# Altium PCB Pod_Islands_Panel_1x2.PcbDoc (part 1 of 2)
Units mm, origin at the board's own origin, x right, y up, seen from the top; angles counter-clockwise.
Board outline 46.91 x 48.3 mm, 6 copper layers (Top Layer, Inner1, Inner2, Inner3, Inner4, Bottom Layer), stack 0.82 mm thick; 110 components, 94 nets, 498 pads, 368 vias.
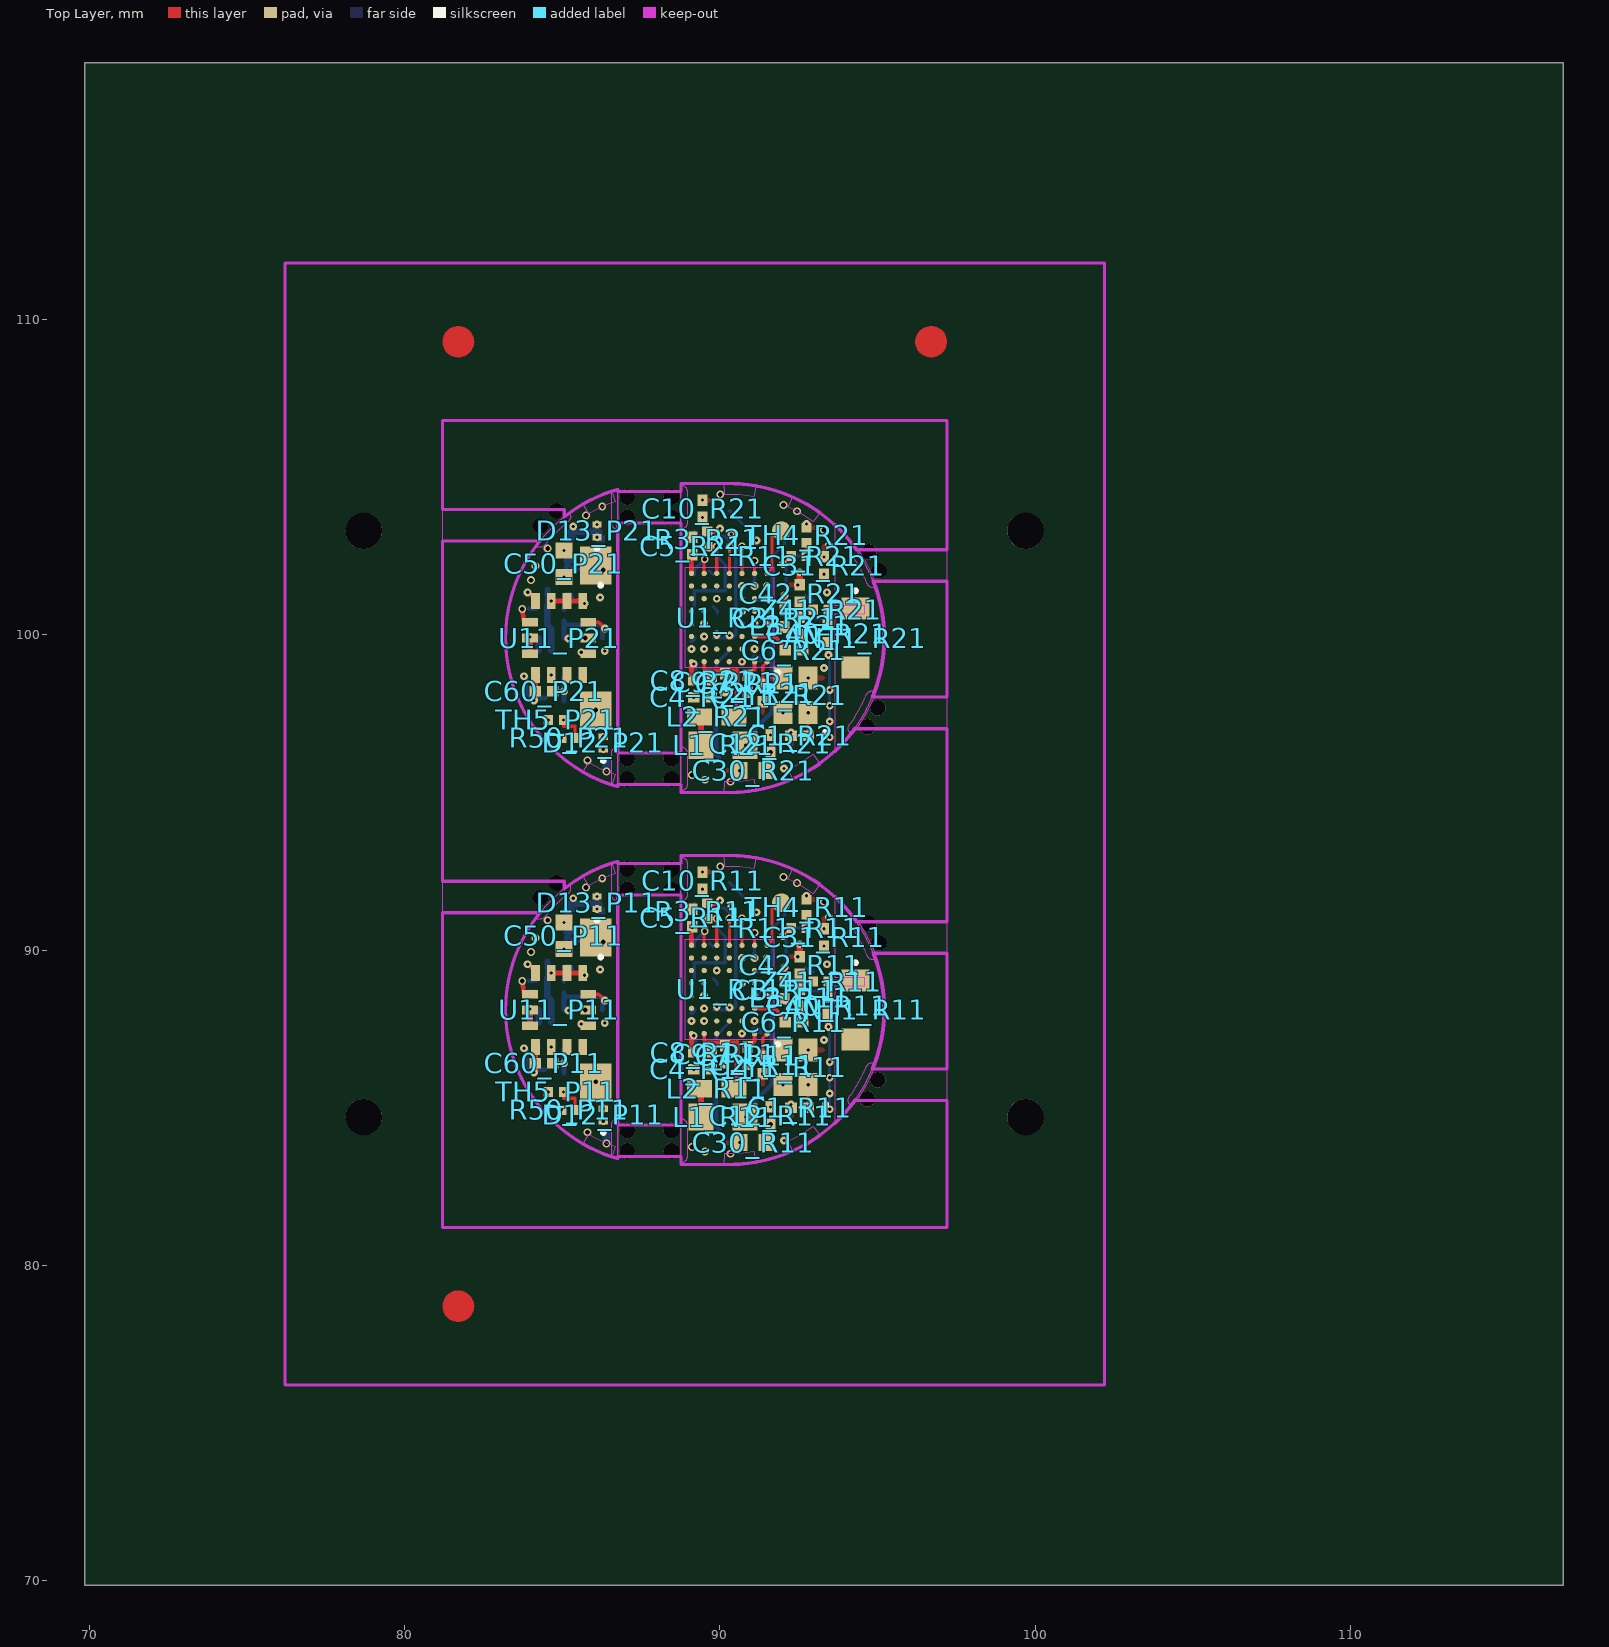
[diagram p0: Top Layer view]
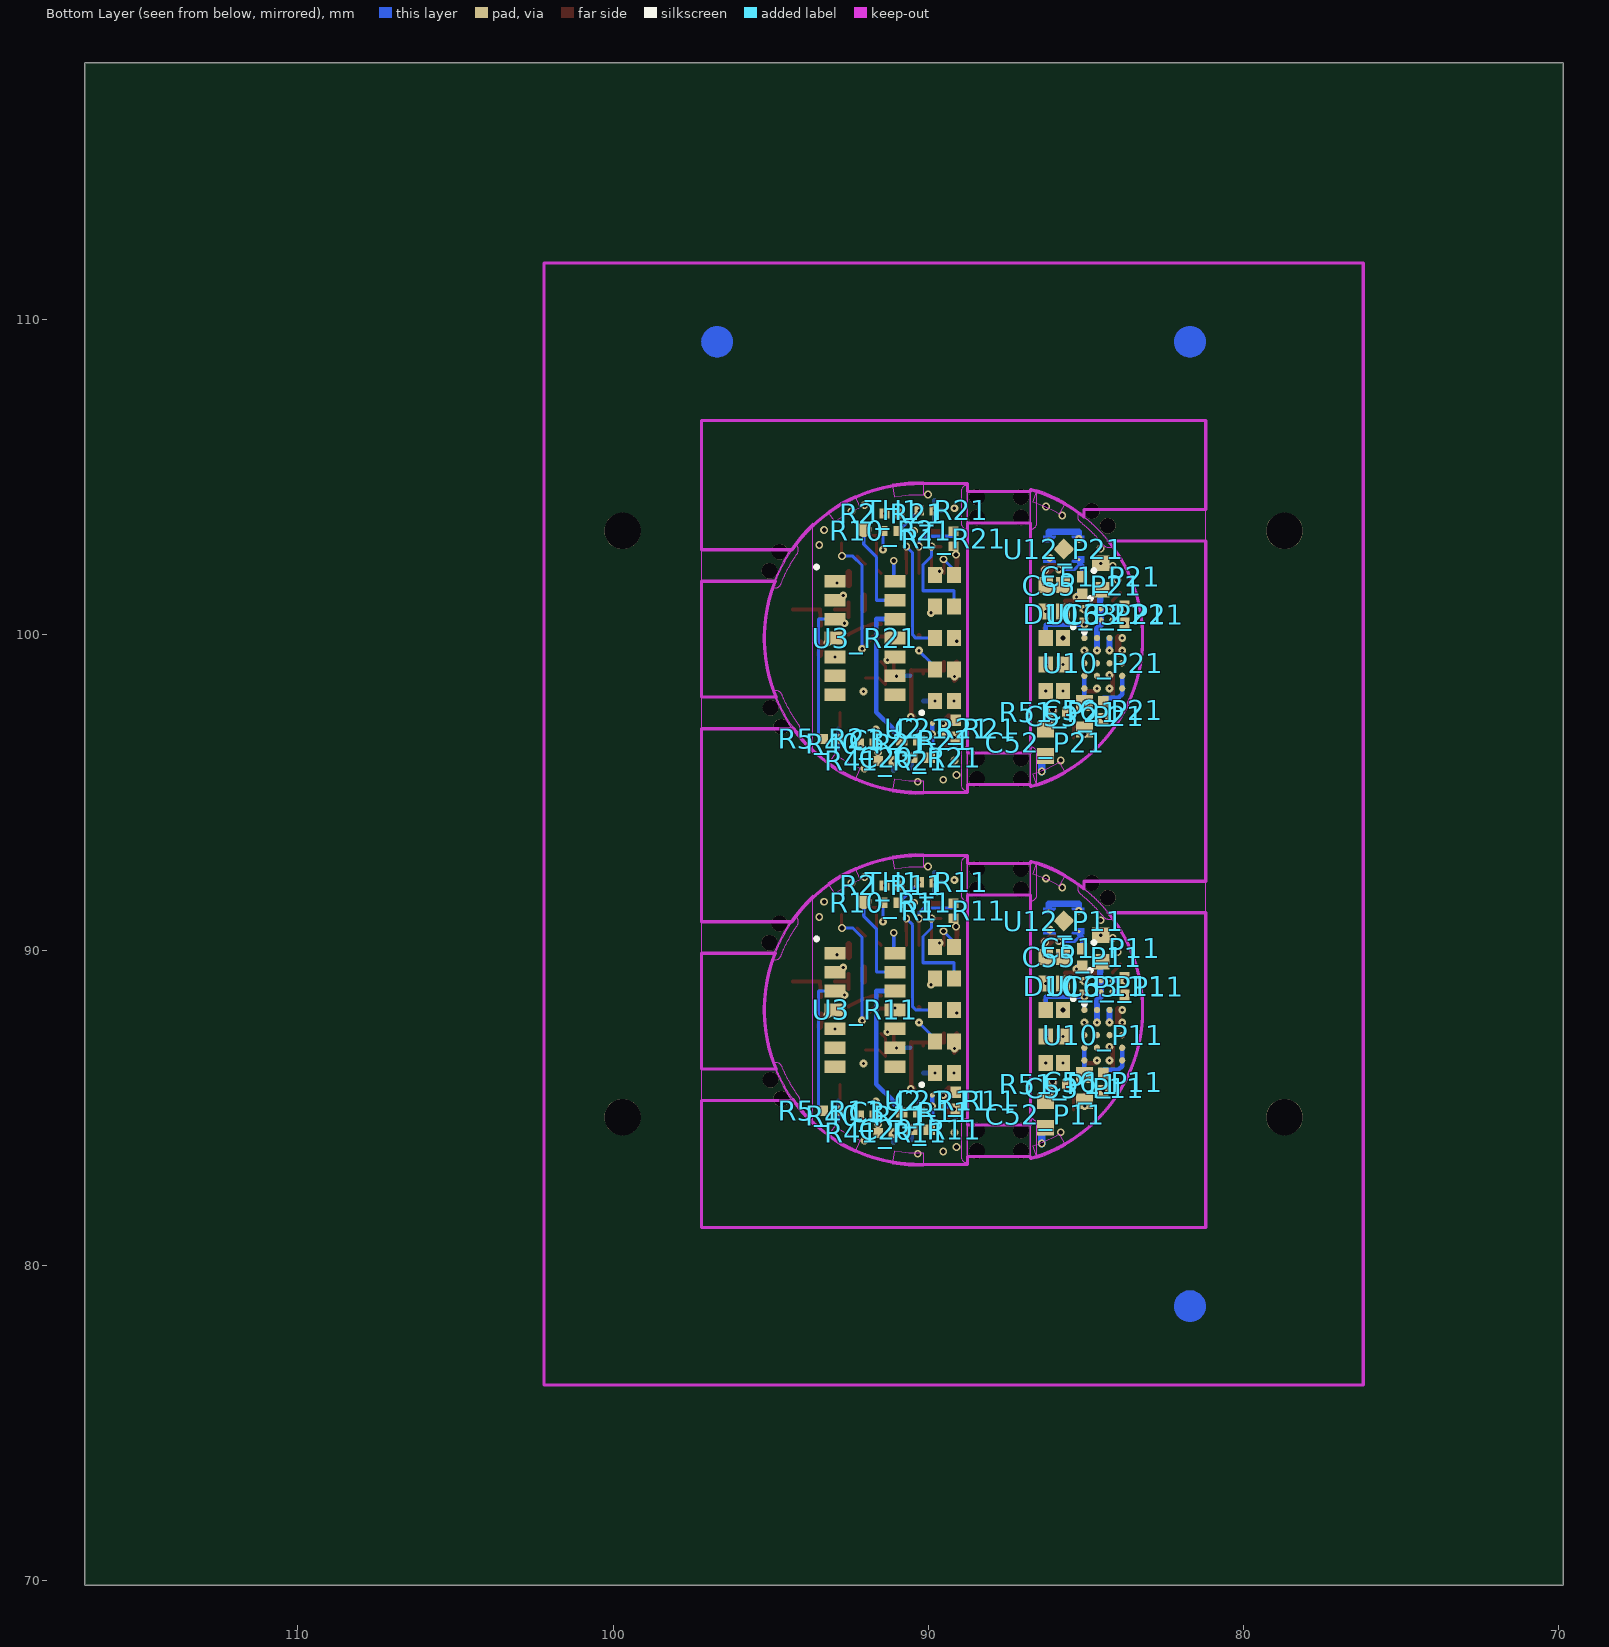
[diagram p1: Bottom Layer view, seen from below]
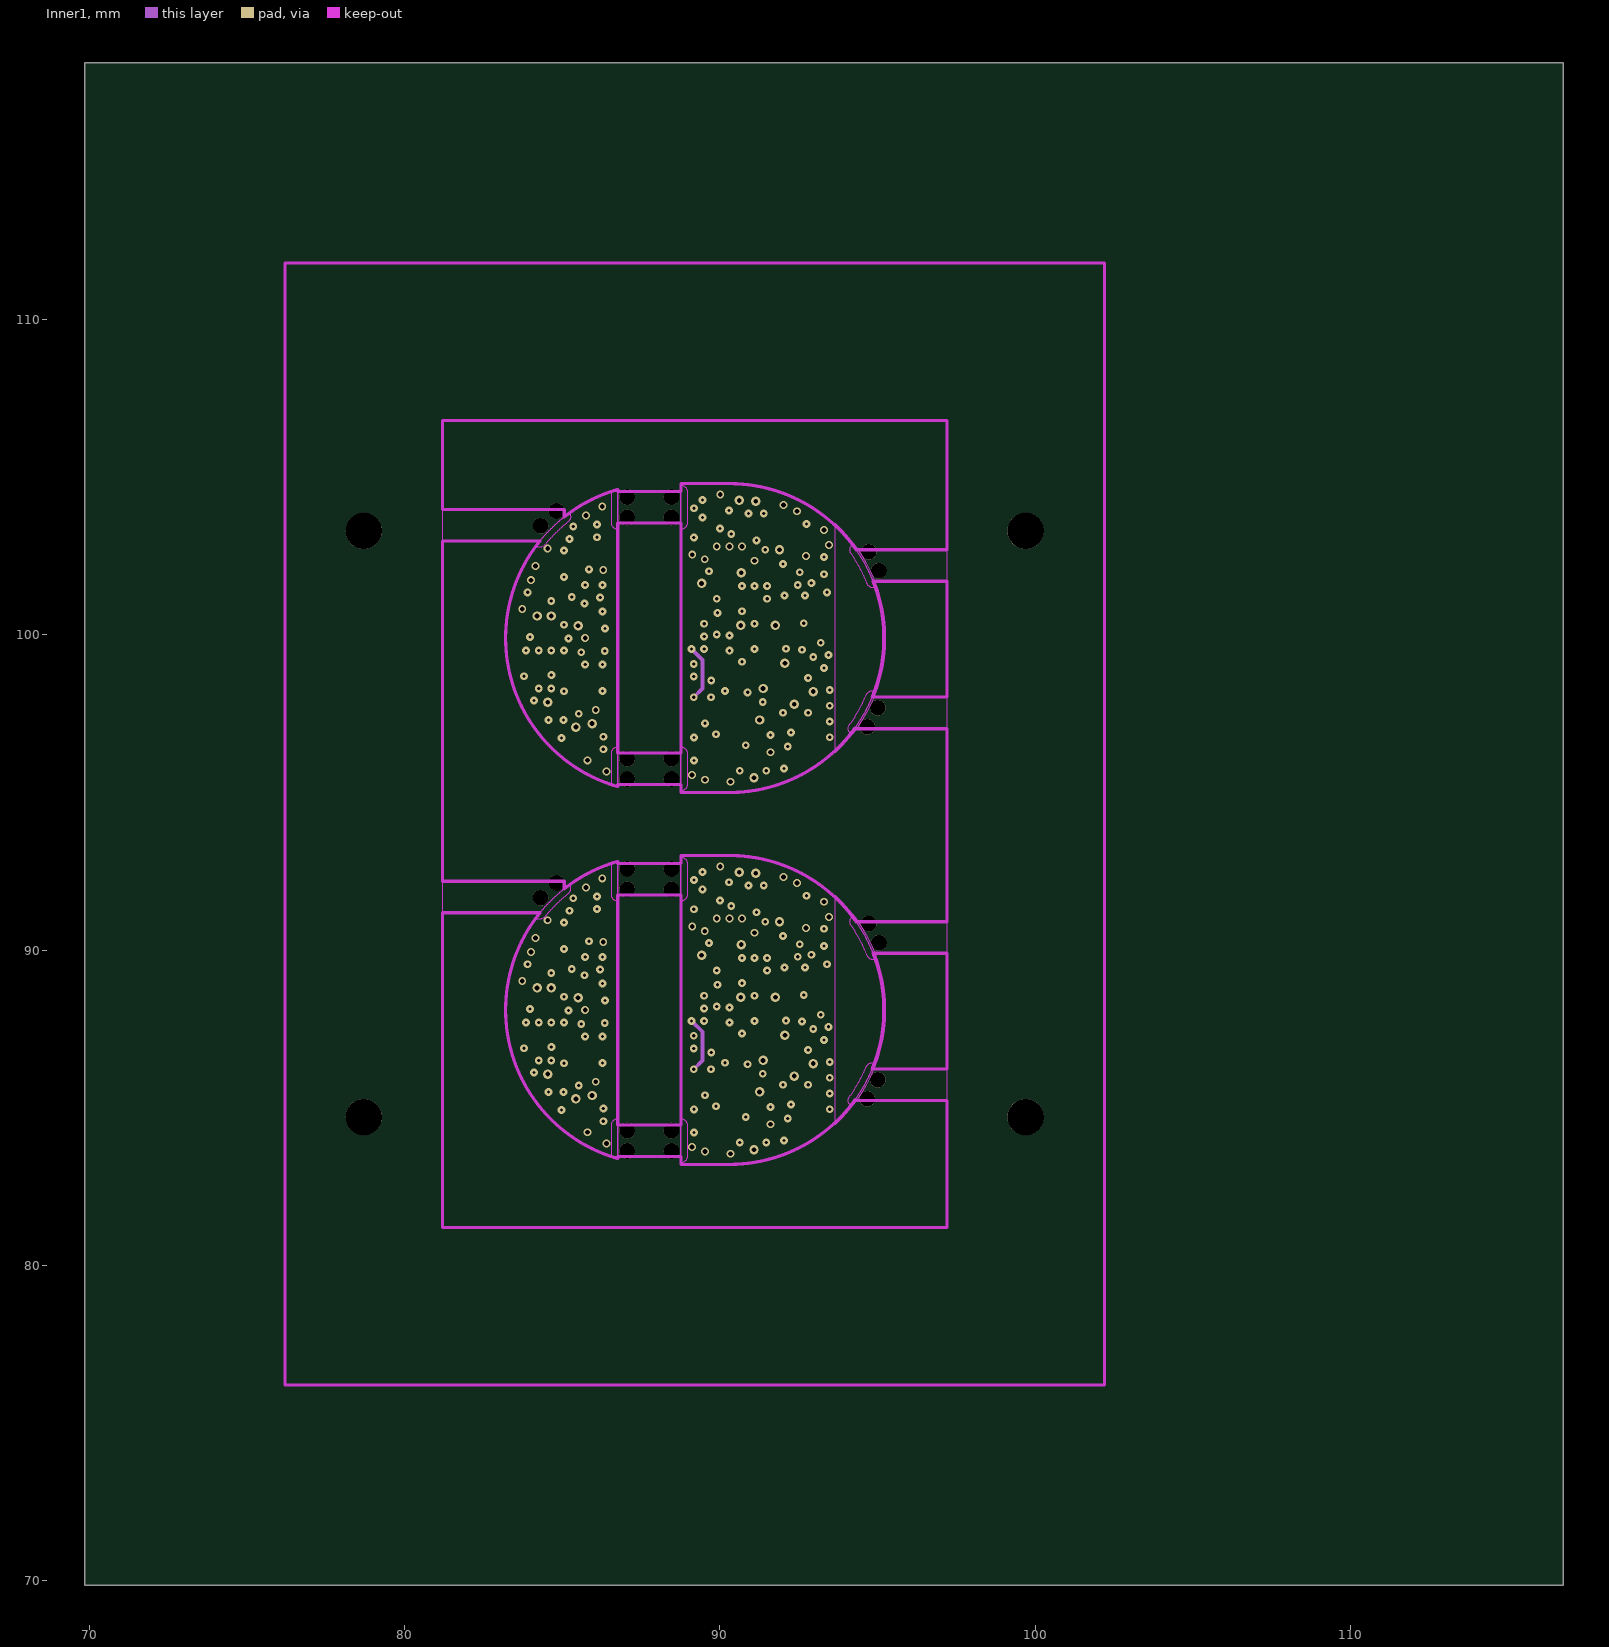
[diagram p2: Inner1]
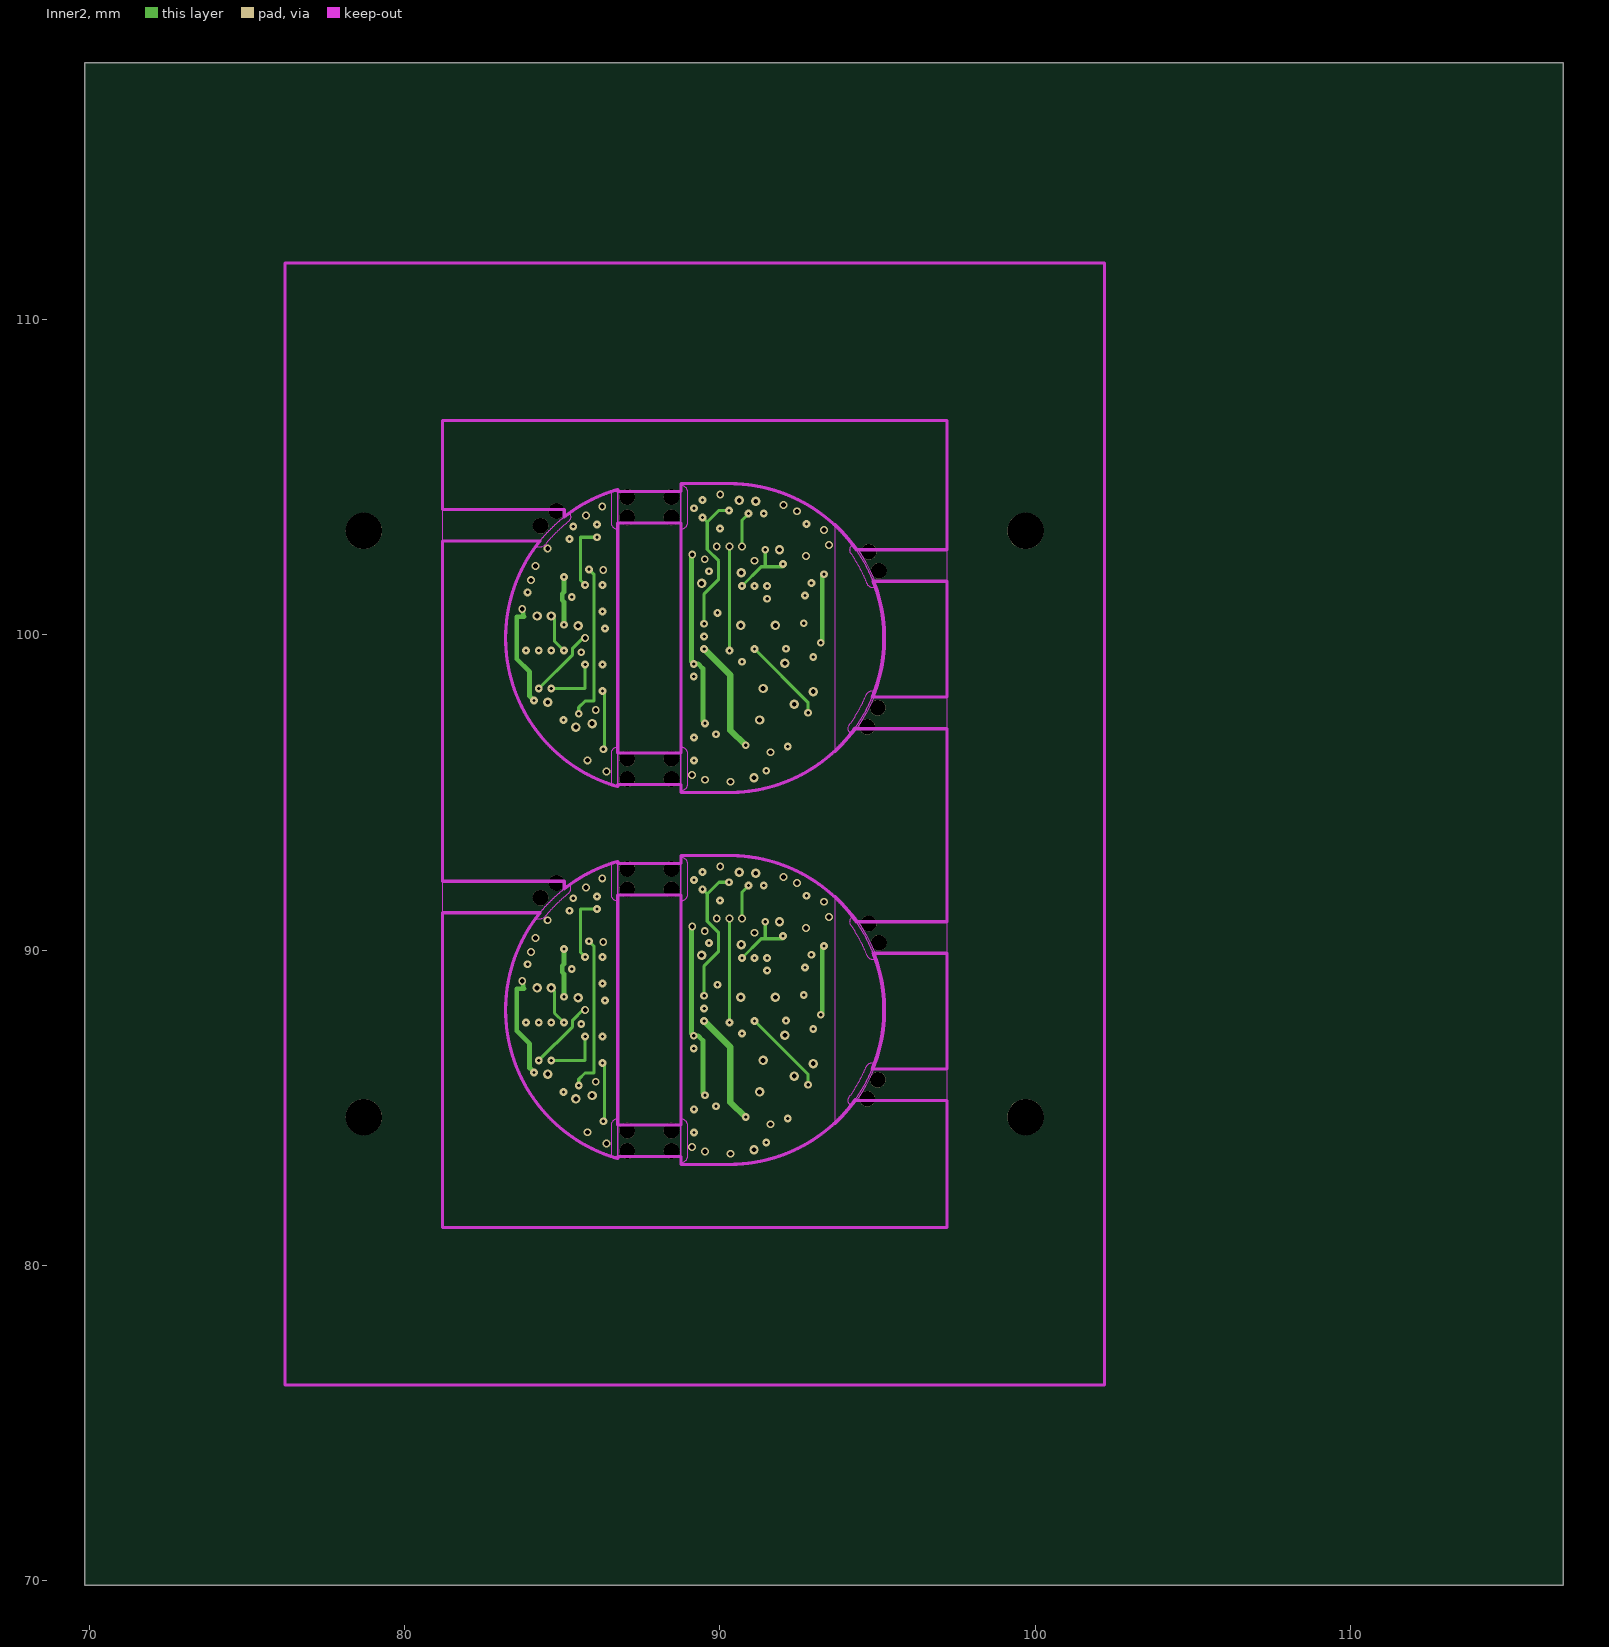
[diagram p3: Inner2]
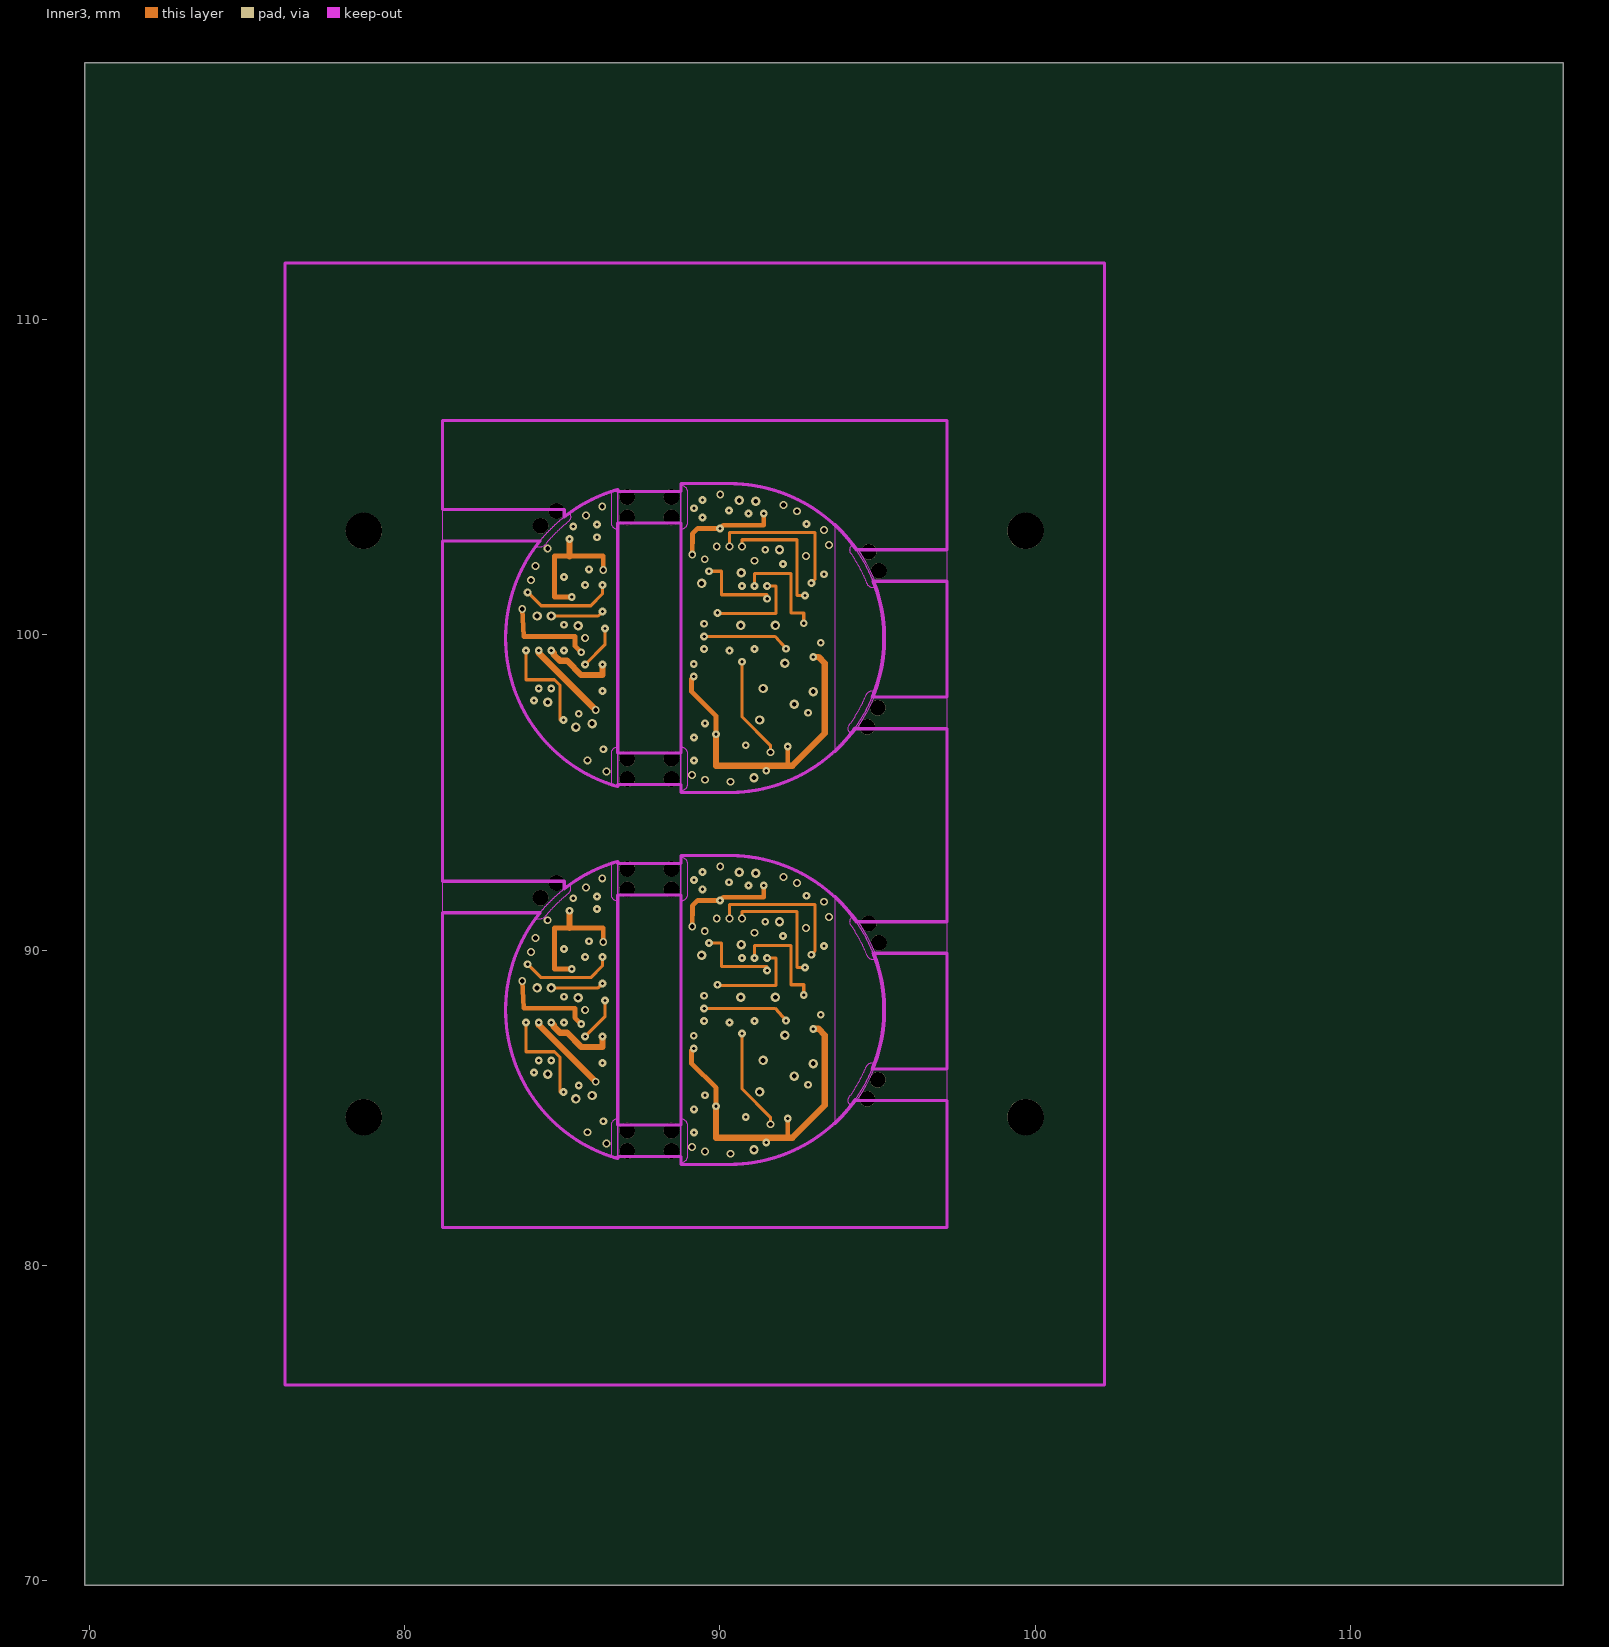
[diagram p4: Inner3]
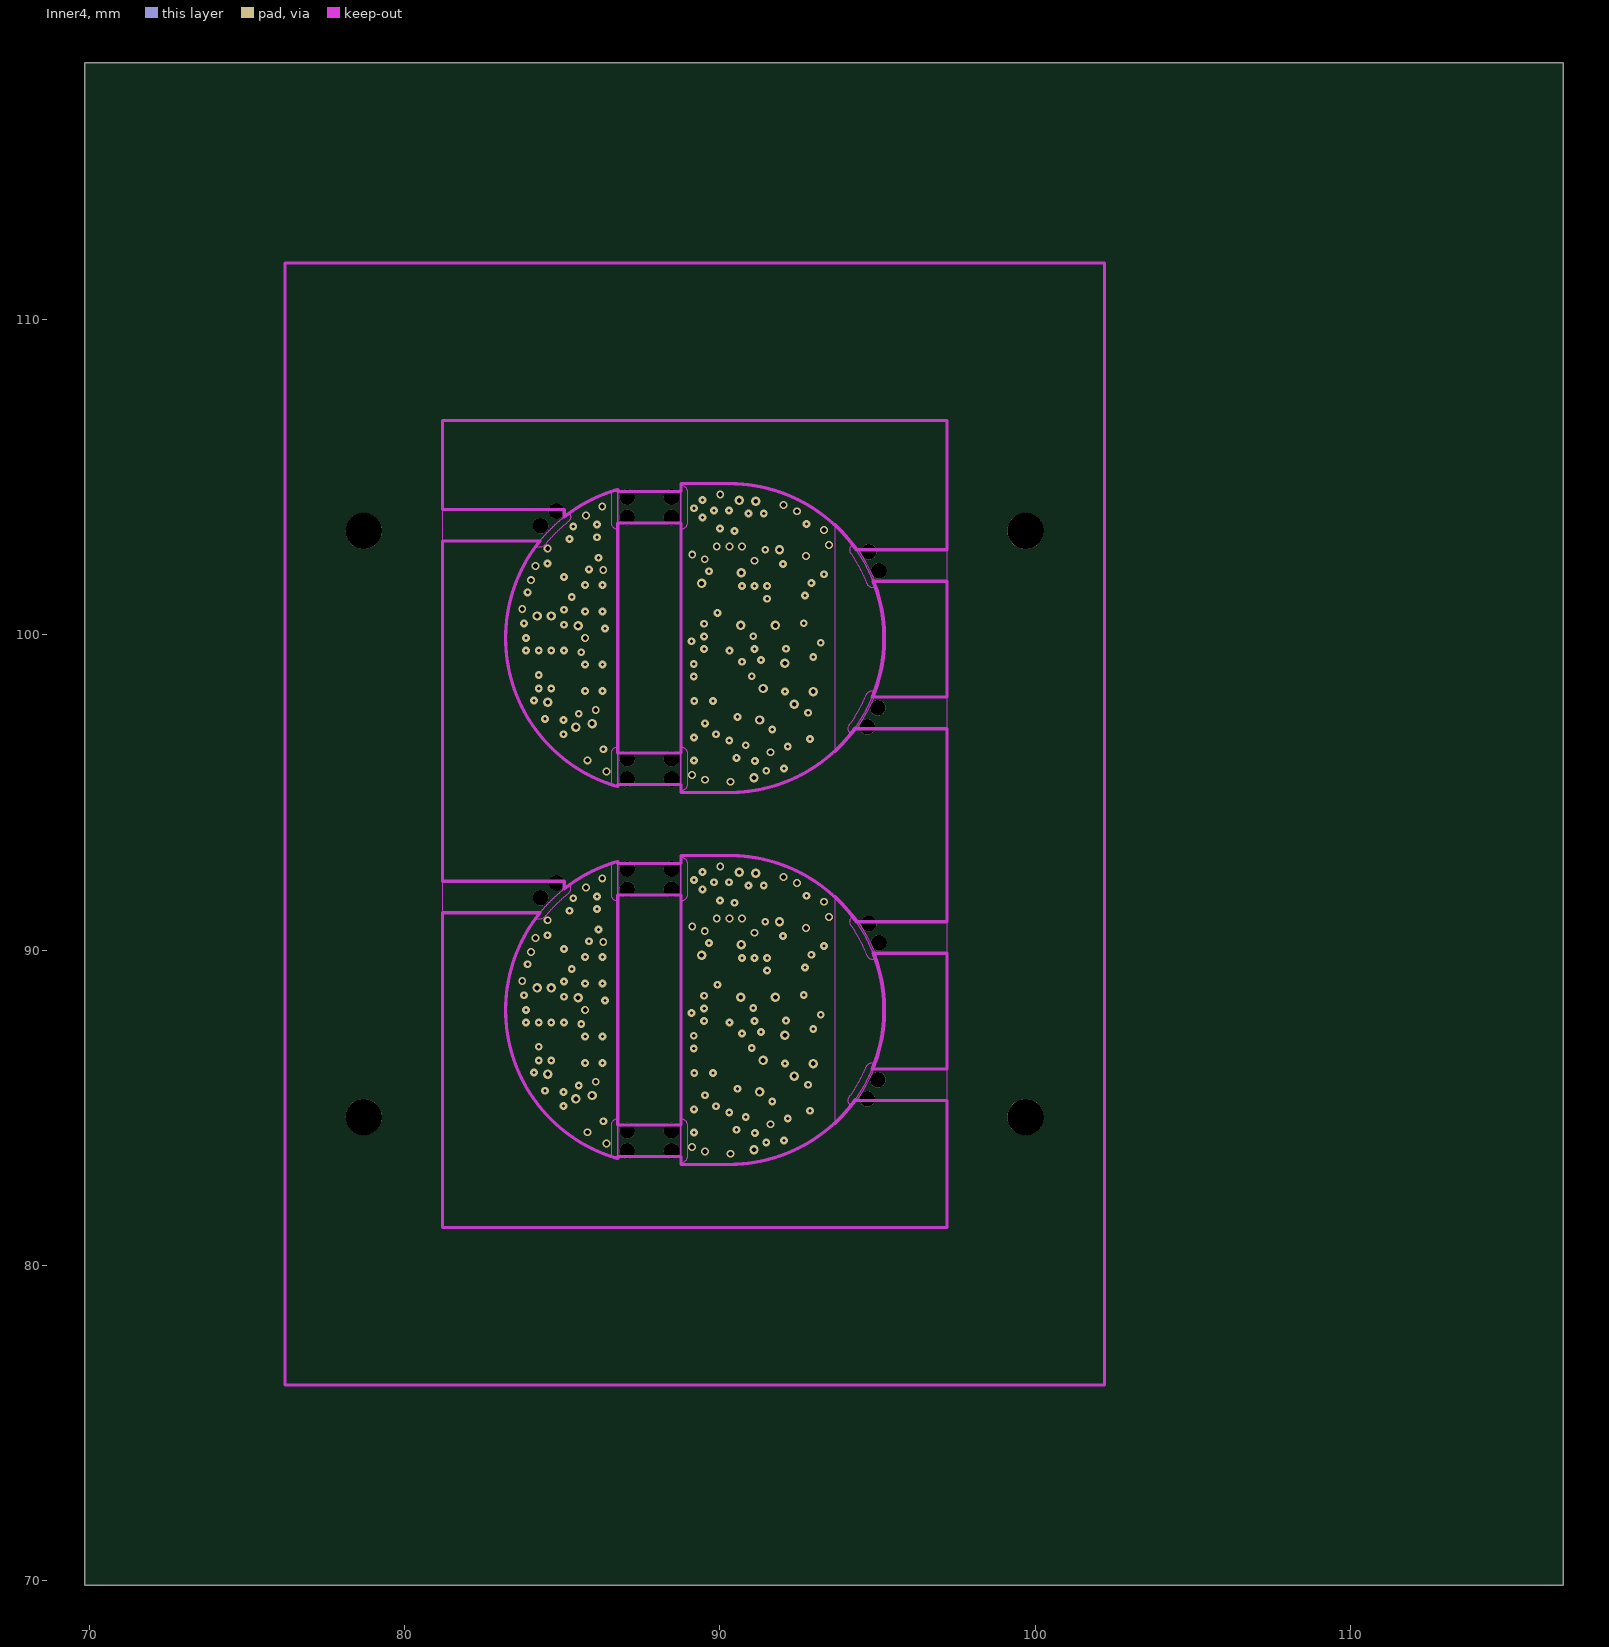
[diagram p5: Inner4]

## Layer stack, top to bottom
Top Solder Mask Layer: solder mask 0.012, Dk 3.8
Top Layer: signal copper 0.035
Dielectric1: surface 0.0964, 2313 PP, Dk 4.1
Inner1: signal copper 0.0152
Dielectric2: surface 0.15, Core 0.15, Dk 4.6
Inner2: signal copper 0.0152
Dielectric3: surface 0.1964, 2x2313 PP, Dk 4.1
Inner3: signal copper 0.0152
Dielectric4: surface 0.15, Core 0.15, Dk 4.6
Inner4: signal copper 0.0152
Dielectric5: surface 0.0964, 2313 PP, Dk 4.1
Bottom Layer: signal copper 0.035
Bottom Solder Mask Layer: solder mask 0.012, Dk 3.8

## Board outline
116.763,69.85 69.85,69.85 69.85,118.15 116.763,118.15

## Design rules (kind name [scope] priority, off if disabled: settings)
BoardOutlineClearance copperThickness1oz [All] p0: genericclearance=0.254 ignorepadtopadclearanceinfootprint=FALSE except(0: Arc-SplitContinuation Track-SplitContinuation SMDPad-SplitContinuation THPad-SplitContinuation Via-SplitContinuation Fill-SplitContinuation Poly-SplitContinuation Region-SplitContinuation Text-SplitContinuation)
BoardOutlineClearance copperThickness2oz [All] p0: genericclearance=0.254 ignorepadtopadclearanceinfootprint=FALSE except(0: Arc-SplitContinuation Track-SplitContinuation SMDPad-SplitContinuation THPad-SplitContinuation Via-SplitContinuation Fill-SplitContinuation Poly-SplitContinuation Region-SplitContinuation Text-SplitContinuation)
BoardOutlineClearance otherClearance [All] p0: genericclearance=0.254 ignorepadtopadclearanceinfootprint=FALSE except(0: Arc-SplitContinuation Track-SplitContinuation SMDPad-SplitContinuation THPad-SplitContinuation Via-SplitContinuation Fill-SplitContinuation Poly-SplitContinuation Region-SplitContinuation Text-SplitContinuation)
Clearance copperThickness1oz [All] p1: gap=0.178 ignorepadtopadclearanceinfootprint=FALSE
Clearance copperThickness2oz [All] p1: gap=0.178 ignorepadtopadclearanceinfootprint=FALSE
Clearance otherClearance [All] p1: gap=0.178 ignorepadtopadclearanceinfootprint=FALSE
DiffPairsRouting differentialPair [All] p1: maxuncoupledlength=10 minlimit=6 maxlimit=Infinity mostfreqgap=6 toplayer_minwidth=5 toplayer_prefwidth=10 toplayer_maxwidth=100 bottomlayer_minwidth=5 bottomlayer_prefwidth=10 bottomlayer_maxwidth=100 midlayer1_minwidth=5 midlayer1_prefwidth=10 midlayer1_maxwidth=100 midlayer2_minwidth=5 midlayer2_prefwidth=10 midlayer2_maxwidth=100 midlayer3_minwidth=5 midlayer3_prefwidth=10 midlayer3_maxwidth=100 midlayer4_minwidth=5 midlayer4_prefwidth=10 midlayer4_maxwidth=100
PasteMaskExpansion pasteMaskExpansion [All] p1: expansion=0
PlaneConnect innerPlane [All] p1: planeconnectstyle=Relief reliefexpansion=0.508 reliefentries=4 reliefconductorwidth=0.15 reliefairgap=0.15
PolygonConnect copperRegion [All] p1: connectstyle=Relief reliefentries=4 reliefconductorwidth=5.9055 polygonreliefangle="90 Angle" airgapwidth=5.9055
RoutingVias viaSize [All] p1: viastyle="Through Hole" holewidth=5.9056 minholewidth=5.9056 maxholewidth=248.0314 width=5.9056 minwidth=5.9056 maxwidth=248.0314
RoutingVias microVia [All] p1: viastyle="Through Hole" holewidth=3.937 minholewidth=3.937 maxholewidth=248.0314 width=3.937 minwidth=3.937 maxwidth=248.0314
RoutingVias buriedVia [All] p1: viastyle="Through Hole" holewidth=5.9056 minholewidth=5.9056 maxholewidth=248.0314 width=5.9056 minwidth=5.9056 maxwidth=248.0314
SolderMaskExpansion solderMaskExpansion [IsVia] p1: useseparateexpansions=TRUE expansion=-1000 expansionbottom=-1000
SolderMaskExpansion solderMaskExpansion [All] p2: useseparateexpansions=TRUE expansion=2 expansionbottom=2
Width copperThickness1oz [All] p1: maxlimit=100 minlimit=4 preferedwidth=4
Width copperThickness2oz [All] p1: maxlimit=100 minlimit=8 preferedwidth=10
Width RF_124 [All] p1: maxlimit=5 minlimit=5 preferedwidth=5
Width SW_200 [All] p1: maxlimit=39 minlimit=8 preferedwidth=10
Width PWR_150 [All] p1: maxlimit=39 minlimit=6 preferedwidth=8
Width DEC_150 [All] p1: maxlimit=20 minlimit=5 preferedwidth=6
Width SIG_100 [All] p1: maxlimit=10 minlimit=4 preferedwidth=4

## Components (designator, comment, footprint, x,y, rotation, side; value= is the part's Value field where it differs from the comment)
ANT1_R11 "KH-1608-H08" ANT-SMD_L1.7-W0.9 94.3,88.1 r90 top
ANT1_R21 "KH-1608-H08" ANT-SMD_L1.7-W0.9 94.3,99.9 r90 top
C1_R11 "12pF" C0201 92.53,85 r180 top
C1_R21 "12pF" C0201 92.53,96.8 r180 top
C2_R11 "12pF" C0201 91.36,86.35 r270 top
C2_R21 "12pF" C0201 91.36,98.15 r270 top
C3_R11 "1pF" C0201 92.05,88.727 r90 top
C3_R21 "1pF" C0201 92.05,100.527 r90 top
C4_R11 "100nF" C0201 89.444,86.22 r0 top
C4_R21 "100nF" C0201 89.444,98.02 r0 top
C5_R11 "100nF" C0201 89.123,91.02 r90 top
C5_R21 "100nF" C0201 89.123,102.82 r90 top
C6_R11 "100pF" C0201 92.35,87.71 r0 top
C6_R21 "100pF" C0201 92.35,99.51 r0 top
C7_R11 "100pF" C0201 90.88,86.651 r270 top
C7_R21 "100pF" C0201 90.88,98.451 r270 top
C8_R11 "4.7uF" C0201 89.449,86.75 r0 top
C8_R21 "4.7uF" C0201 89.449,98.55 r0 top
C9_R11 "1uF" C0201 90.16,86.696 r270 top
C9_R21 "1uF" C0201 90.16,98.496 r270 top
C10_R11 "10nF" C0201 89.45,92.2 r90 top
C10_R21 "10nF" C0201 89.45,104 r90 top
C12_R11 "100nF" C0201 91.6,84.75 r90 top
C12_R21 "100nF" C0201 91.6,96.55 r90 top
C20_R11 "1uF" C0201 90.25,84.3 r0 bottom
C20_R21 "1uF" C0201 90.25,96.1 r0 bottom
C21_R11 "1uF" C0201 89.13,85.22 r270 bottom
C21_R21 "1uF" C0201 89.13,97.02 r270 bottom
C30_R11 "10uF" C0402 91.05,83.89 r180 top
C30_R21 "10uF" C0402 91.05,95.69 r180 top
C31_R11 "1uF" C0201 93.3,90.4 r90 top
C31_R21 "1uF" C0201 93.3,102.2 r90 top
C32_R11 "1uF" C0201 90.57,84.85 r180 bottom
C32_R21 "1uF" C0201 90.57,96.65 r180 bottom
C40_R11 "100pF" C0201 93.411,88.229 r270 top
C40_R21 "100pF" C0201 93.411,100.029 r270 top
C42_R11 "100pF" C0201 92.53,89.511 r90 top
C42_R21 "100pF" C0201 92.53,101.311 r90 top
C50_P11 "10uF" C0402 85.051,90.456 r90 top
C50_P21 "10uF" C0402 85.051,102.256 r90 top
C51_P11 "22uF" C0402 84.53,90.05 r90 bottom
C51_P21 "22uF" C0402 84.53,101.85 r90 bottom
C52_P11 "10uF" C0402 86.285,84.78 r270 bottom
C52_P21 "10uF" C0402 86.285,96.58 r270 bottom
C53_P11 "4.7uF" C0402 85.04,85.62 r270 bottom
C53_P21 "4.7uF" C0402 85.04,97.42 r270 bottom
C55_P11 "100nF" C0201 85.12,89.765 r270 bottom
C55_P21 "100nF" C0201 85.12,101.565 r270 bottom
C56_P11 "1uF" C0201 84.45,85.81 r270 bottom
C56_P21 "1uF" C0201 84.45,97.61 r270 bottom
C60_P11 "100nF" C0201 84.42,86.41 r0 top
C60_P21 "100nF" C0201 84.42,98.21 r0 top
C63_P11 "1uF" C0201 83.78,88.84 r270 bottom
C63_P21 "1uF" C0201 83.78,100.64 r270 bottom
D10_P11 "ESD5V3U04-0201" X3-DFN0603-2_L0.6-W0.3-RD 85.05,88.85 r90 bottom
D10_P21 "ESD5V3U04-0201" X3-DFN0603-2_L0.6-W0.3-RD 85.05,100.65 r90 bottom
D12_P11 "ESD5V3U04-0201" X3-DFN0603-2_L0.6-W0.3-RD 86.3,84.77 r90 top
D12_P21 "ESD5V3U04-0201" X3-DFN0603-2_L0.6-W0.3-RD 86.3,96.57 r90 top
D13_P11 "ESD5V3U04-0201" X3-DFN0603-2_L0.6-W0.3-RD 86.1,91.5 r90 top
D13_P21 "ESD5V3U04-0201" X3-DFN0603-2_L0.6-W0.3-RD 86.1,103.3 r90 top
L1_R11 "10uH" L0603 90.1,84.7 r180 top
L1_R21 "10uH" L0603 90.1,96.5 r180 top
L2_R11 "15nH" L0402-R-RD 89.9,85.6 r0 top
L2_R21 "15nH" L0402-R-RD 89.9,97.4 r0 top
L3_R11 "3.3nH" L0201-RD 92.53,88.488 r90 top
L3_R21 "3.3nH" L0201-RD 92.53,100.288 r90 top
R1_R11 "4.7kΩ" R0201 89.2,91.25 r90 bottom
R1_R21 "4.7kΩ" R0201 89.2,103.05 r90 bottom
R2_R11 "4.7kΩ" R0201 91.15,92.05 r180 bottom
R2_R21 "4.7kΩ" R0201 91.15,103.85 r180 bottom
R3_R11 "100kΩ" R0201 89.599,91.24 r270 top
R3_R21 "100kΩ" R0201 89.599,103.04 r270 top
R5_R11 "1MΩ" R0201 93.1,84.9 r180 bottom
R5_R21 "1MΩ" R0201 93.1,96.7 r180 bottom
R10_R11 "10kΩ" R0201 91.2,91.5 r180 bottom
R10_R21 "10kΩ" R0201 91.2,103.3 r180 bottom
R11_R11 "10kΩ" R0201 92.5,90.7 r0 top
R11_R21 "10kΩ" R0201 92.5,102.5 r0 top
R40_R11 "2.2MΩ" R0201 91.95,84.75 r180 bottom
R40_R21 "2.2MΩ" R0201 91.95,96.55 r180 bottom
R41_R11 "1MΩ" R0201 91.35,84.2 r180 bottom
R41_R21 "1MΩ" R0201 91.35,96 r180 bottom
R50_P11 "10kΩ" R0201 85.22,84.93 r180 top
R50_P21 "10kΩ" R0201 85.22,96.73 r180 top
R51_P11 "330Ω" R0201 85.85,85.75 r180 bottom
R51_P21 "330Ω" R0201 85.85,97.55 r180 bottom
TH1_R11 "NCP03XH103F05RL" R0201 90.05,92.15 r180 bottom
TH1_R21 "NCP03XH103F05RL" R0201 90.05,103.95 r180 bottom
TH4_R11 "NCP03XH103F05RL" R0201 92.75,91.36 r90 top
TH4_R21 "NCP03XH103F05RL" R0201 92.75,103.16 r90 top
TH5_P11 "NCP03XH103F05RL" R0201 84.799,85.501 r180 top
TH5_P21 "NCP03XH103F05RL" R0201 84.799,97.301 r180 top
U1_R11 "NRF52832-CIAA-G-R7" WLCSP-50_L3.2-W3.0-TL_NRF52832 90.3,88.75 r180 top
U1_R21 "NRF52832-CIAA-G-R7" WLCSP-50_L3.2-W3.0-TL_NRF52832 90.3,100.55 r180 top
U2_R11 "TPS7A0218PYCHR" WLCSP-4_L0.6-W0.6-P0.35-R2-C2-TL 89.7,85.22 r180 bottom
U2_R21 "TPS7A0218PYCHR" WLCSP-4_L0.6-W0.6-P0.35-R2-C2-TL 89.7,97.02 r180 bottom
U3_R11 "MAXM86161AEFD+T" OLGA-14_L4.3-W2.9-P0.60-TL 92.01,88.1 r180 bottom
U3_R21 "MAXM86161AEFD+T" OLGA-14_L4.3-W2.9-P0.60-TL 92.01,99.9 r180 bottom
U10_P11 "BQ21061YFPR" DSBGA-20_L2.0-W1.6-R4-C5-P0.40-BL-1 84.45,87.3 r270 bottom
U10_P21 "BQ21061YFPR" DSBGA-20_L2.0-W1.6-R4-C5-P0.40-BL-1 84.45,99.1 r270 bottom
U11_P11 "LSM6DSV16BXTR" LGA-14L_L3.0-W2.5-P0.50-TL 84.9,88.1 r270 top
U11_P21 "LSM6DSV16BXTR" LGA-14L_L3.0-W2.5-P0.50-TL 84.9,99.9 r270 top
U12_P11 "AP6683" DFN-4_L1.0-W1.0-P0.65-BL-EP 85.7,90.92 r90 bottom
U12_P21 "AP6683" DFN-4_L1.0-W1.0-P0.65-BL-EP 85.7,102.72 r90 bottom
U13_P11 "TPS7A0218PYCHR" WLCSP-4_L0.6-W0.6-P0.35-R2-C2-TL 84.35,88.85 r180 bottom
U13_P21 "TPS7A0218PYCHR" WLCSP-4_L0.6-W0.6-P0.35-R2-C2-TL 84.35,100.65 r180 bottom
Y1_R11 "-" CRYSTAL-SMD_4P-L1.6-W1.2-BL 92.4,86.28 r90 top
Y1_R21 "-" CRYSTAL-SMD_4P-L1.6-W1.2-BL 92.4,98.08 r90 top
Z41_R11 "0Ω" R0201 93.2,89 r0 top
Z41_R21 "0Ω" R0201 93.2,100.8 r0 top

## Footprints (in the part's own frame and the unit in brackets; to place one, negate y for a bottom-side part, rotate by r counter-clockwise, add the part's x,y. Pads: shape width x height; smd on the part's side, far side on the other; paste and mask are expansions set on the pad)
ANT-SMD_L1.7-W0.9 [mm]
  rect 0.7x0.9 smd paste+0 mask+0.051: 1(-0.937,0) 2(0.937,0)
  silkscreen extent 1.4,-0.1 1.6,0.1
C0201 [mm]
  rect 0.368x0.324 smd paste-100 mask+0.051: 1(-0.274,0) 2(0.274,0)
C0402 [mm]
  rect 0.5x0.54 smd paste+0 mask+0.051: 1(-0.42,0) 2(0.42,0)
CRYSTAL-SMD_4P-L1.6-W1.2-BL [mm]
  rect 0.73x0.6 smd paste+0 mask+0.05: 1(-0.55,-0.4) 2(0.55,-0.4) 3(0.55,0.4) 4(-0.55,0.4)
  silkscreen extent -1.27,-1.05 -1.07,-0.85
DFN-4_L1.0-W1.0-P0.65-BL-EP [mm]
  round 0.092 smd: 1(-0.333,-0.475) 2(0.333,-0.474) 3(0.333,0.475) 4(-0.333,0.475)
  rect 0.48x0.48 smd rot 45: 5(0.004,0.001)
  Top Layer region: 0.425,-0.649 0.225,-0.649 0.225,-0.399 0.225,-0.399 0.375,-0.249 0.425,-0.249
  Top Layer region: -0.225,-0.4 -0.225,-0.65 -0.425,-0.65 -0.425,-0.25 -0.375,-0.25
  Top Layer region: -0.425,0.651 -0.225,0.651 -0.225,0.401 -0.225,0.401 -0.375,0.251 -0.425,0.251
  Top Layer region: 0.425,0.651 0.225,0.651 0.225,0.401 0.225,0.401 0.375,0.251 0.425,0.251
  silkscreen extent -0.78,-1.06 -0.58,-0.85
DSBGA-20_L2.0-W1.6-R4-C5-P0.40-BL-1 [mm]
  round 0.2 smd paste-100 mask+0.051: A1(-0.8,-0.6) A2(-0.8,-0.2) A3(-0.8,0.2) A4(-0.8,0.6) B1(-0.4,-0.6) B2(-0.4,-0.2) B3(-0.4,0.2) B4(-0.4,0.6) C1(0,-0.6) C2(0,-0.2) C3(0,0.2) C4(0,0.6) D1(0.4,-0.6) D2(0.4,-0.2) D3(0.4,0.2) D4(0.4,0.6) E1(0.8,-0.6) E2(0.8,-0.2) E3(0.8,0.2) E4(0.8,0.6)
  silkscreen extent -1.26,-1.06 -1.05,-0.85
L0201-RD [mm]
  rect 0.368x0.324 smd paste-100 mask+0.051: 1(-0.274,0) 2(0.274,0)
L0402-R-RD [mm]
  rect 0.79x0.54 smd paste-100 mask+0.051: 1(-0.545,0) 2(0.545,0)
L0603 [mm]
  rect 0.8x0.864 smd paste-100 mask+0.051: 1(-0.7,0) 2(0.7,0)
LGA-14L_L3.0-W2.5-P0.50-TL [mm]
  rect 0.5x0.28 smd: 1(-1.175,0.75) 2(-1.175,0.25) 3(-1.175,-0.25) 4(-1.175,-0.75) 8(1.175,-0.75) 9(1.175,-0.25) 10(1.175,0.25) 11(1.175,0.75)
  rect 0.28x0.5 smd: 5(-0.5,-0.925) 6(0,-0.925) 7(0.5,-0.925) 12(0.5,0.925) 13(0,0.925) 14(-0.5,0.925)
  silkscreen extent -1.78,1.22 -1.58,1.42
OLGA-14_L4.3-W2.9-P0.60-TL [mm]
  rect 0.66x0.4 smd: 1(-0.95,1.8) 2(-0.95,1.2) 3(-0.95,0.6) 4(-0.95,0) 5(-0.95,-0.6) 6(-0.95,-1.2) 7(-0.95,-1.8) 8(0.95,-1.8) 9(0.95,-1.2) 10(0.95,-0.6) 11(0.95,0) 12(0.95,0.6) 13(0.95,1.2) 14(0.95,1.8)
  silkscreen extent -1.64,2.15 -1.43,2.36
R0201 [mm]
  rect 0.303x0.324 smd paste-100 mask+0.051: 1(-0.242,0) 2(0.242,0)
WLCSP-4_L0.6-W0.6-P0.35-R2-C2-TL [mm]
  round 0.158 smd paste-100 mask+0.05: A1(-0.175,0.175) A2(0.175,0.175) B1(-0.175,-0.175) B2(0.175,-0.175)
  silkscreen extent -0.61,0.41 -0.41,0.61
WLCSP-50_L3.2-W3.0-TL_NRF52832 [mm]
  round 0.17 smd paste-100 mask+0.051: A1(-1.2,1.4) A2(-0.8,1.4) A3(-0.4,1.4) A4(0,1.4) A5(0.4,1.4) A6(0.8,1.4) A7(1.2,1.4) B2(-0.8,1) B3(-0.4,1) B4(0,1) B5(0.4,1) B6(0.8,1) B7(1.2,1) C2(-0.8,0.6) C3(-0.4,0.6) C4(0,0.6) C5(0.4,0.6) C6(0.8,0.6) C7(1.2,0.6) D1(-1.2,0.2) D2(-0.8,0.2) D3(-0.4,0.2) D6(0.8,0.2) D7(1.2,0.2) E1(-1.2,-0.2) E2(-0.8,-0.2) E3(-0.4,-0.2) E6(0.8,-0.2) E7(1.2,-0.2) F1(-1.2,-0.6) F2(-0.8,-0.6) F3(-0.4,-0.6) F4(0,-0.6) F5(0.4,-0.6) F6(0.8,-0.6) F7(1.2,-0.6) G1(-1.2,-1) G2(-0.8,-1) G3(-0.4,-1) G4(0,-1) G5(0.4,-1) G6(0.8,-1) G7(1.2,-1) H1(-1.2,-1.4) H2(-0.8,-1.4) H3(-0.4,-1.4) H4(0,-1.4) H5(0.4,-1.4) H6(0.8,-1.4) H7(1.2,-1.4)
  silkscreen extent -1.64,1.64 -1.44,1.84
X3-DFN0603-2_L0.6-W0.3-RD [mm]
  rect 0.2x0.3 smd: 1(-0.2,0) 2(0.2,0)
  silkscreen extent -0.66,-0.1 -0.45,0.1

## Free pads (board coordinates)
  rect 1.001x1.199 smd paste+0 mask+0.051: BT1(86.058,85.8) BT1(86.058,97.601) BT2(86.058,90.4) BT2(86.058,102.201)
  rect 0.45x0.5 smd far side paste+0 mask+0: JP1(86.274,86.42) JP1(86.274,98.221) JP2(86.274,87.261) JP2(86.274,99.062) JP3(86.274,88.099) JP3(86.274,99.9) JP4(86.274,88.94) JP4(86.274,100.741) JP5(86.274,89.781) JP5(86.274,101.581) JP6(85.723,86.42) JP6(85.723,98.221) JP7(85.723,87.261) JP7(85.723,99.062) JP8(85.723,88.099) JP8(85.723,99.9) JP9(85.723,88.94) JP9(85.723,100.741) JP10(85.723,89.781) JP10(85.723,101.581)
  rect 0.45x0.5 smd far side paste+0 mask+0.051: JR1(89.185,86.1) JR1(89.185,97.901) JR2(89.185,87.101) JR2(89.185,98.902) JR3(89.185,88.099) JR3(89.185,99.9) JR4(89.185,89.1) JR4(89.185,100.901) JR5(89.185,90.101) JR5(89.185,101.901) JR6(89.784,86.1) JR6(89.784,97.901) JR7(89.784,87.101) JR7(89.784,98.902) JR8(89.784,88.099) JR8(89.784,99.9) JR9(89.784,89.1) JR9(89.784,100.901) JR10(89.784,90.101) JR10(89.784,101.901)
  round 0.5 hole 0.5 unplated: MB1(87.06,83.625) MB2(87.06,84.275) MB3(88.46,83.625) MB4(88.46,84.275) MB5(87.06,91.925) MB6(87.06,92.575) MB7(88.46,91.925) MB8(88.46,92.575) MB9(84.813,92.13) MB10(84.309,91.66) MB11(94.671,85.283) MB12(95.005,85.886) MB13(95.043,90.232) MB14(94.719,90.84) MB15(87.06,95.425) MB16(87.06,96.075) MB17(88.46,95.425) MB18(88.46,96.075) MB19(87.06,103.725) MB20(87.06,104.375) MB21(88.46,103.725) MB22(88.46,104.375) MB23(84.813,103.93) MB24(84.309,103.46) MB25(94.671,97.083) MB26(95.005,97.686) MB27(95.043,102.032) MB28(94.719,102.64)
  round 1.152 hole 1.152 unplated: TH1(78.7,84.7) TH2(99.7,84.7) TH3(78.7,103.3) TH4(99.7,103.3)
  round 0.599 smd paste+0 mask+0.051: TP1(91.951,91.5) TP1(91.951,103.301)
  round 0.5 smd far side paste+0 mask+0.051: TP2(92.05,91.551) TP2(92.05,103.352)

## Via types
v1: diameter 0.249, hole 0.102, Top Layer to Inner1, 92 vias
v2: diameter 0.249, hole 0.102, Inner1 to Bottom Layer, 74 vias
v3: diameter 0.249, hole 0.102, Top Layer to Inner4, 58 vias
v4: diameter 0.249, hole 0.152, Top Layer to Bottom Layer, 54 vias
v5: diameter 0.249, hole 0.102, Inner4 to Bottom Layer, 52 vias
v6: diameter 0.3, hole 0.152, Inner1 to Inner4, 38 vias

## Nets (pads, with @x,y where several pads share a name; then routed paths per layer and width w, separated by ;. In a path a pad name is that pad's centre, name@x,y a point inside that pad or via, vN(x,y) a via of type N, cw(c..) or ccw(c..) an arc to the next point about the centre after c; other vN are vias at no path point)
ANT_FEED_R11: ANT1_R11.2 C40_R11.1 Z41_R11.2 | length 1.4
  Top Layer w0.124: C40_R11.1@93.411,88.503 93.442,89.001 ANT1_R11.2@94.301,89.001
ANT_FEED_R21: ANT1_R21.2 C40_R21.1 Z41_R21.2 | length 1.4
  Top Layer w0.124: C40_R21.1@93.412,100.303 Z41_R21.2@93.442,100.8 ANT1_R21.2@94.301,100.801
ANT_NRF_R11: C3_R11.1 L3_R11.1 U1_R11.D1 | length 1.1
  Top Layer w0.124: U1_R11.D1@91.499,88.551 91.679,88.551 cw(c91.682,88.18) 91.865,88.503 ccw(c92.052,88.825) C3_R11.1@92.05,88.452 L3_R11.1@92.53,88.213
ANT_NRF_R21: C3_R21.1 L3_R21.1 U1_R21.D1 | length 1.1
  Top Layer w0.124: U1_R21.D1@91.499,100.351 91.679,100.351 cw(c91.682,99.981) 91.865,100.304 ccw(c92.052,100.626) 92.05,100.253 L3_R21.1@92.53,100.013
BQ_VDD_P11: C53_P11.1 U10_P11.D1 U10_P11.E1 | length 0.8
  Bottom Layer w0.15: C53_P11.1@85.051,86.1 85.051,86.499 U10_P11.D1@85.051,86.9
BQ_VDD_P21: C53_P21.1 U10_P21.D1 U10_P21.E1 | length 0.8
  Bottom Layer w0.15: C53_P21.1@85.051,97.9 85.051,98.299 U10_P21.D1@85.051,98.7
CELL_N_P11: C55_P11.2 pad.BT2@86.058,90.4 U12_P11.2 U12_P11.3 | length 6.3
  Top Layer w0.3: pad.BT2@86.06,90.4 86.2,90.26 v4(86.3,90.26)
  Inner3 w0.15: v2(85.3,89.4) 84.75,89.4 84.75,90.7 85.226,90.7 86.3,90.7 v4(86.3,90.26)
  Inner3 w0.2: 85.226,90.7 v2(85.226,91.246)
  Bottom Layer w0.15: C55_P11.2@85.12,89.49 85.27,89.49 v2(85.3,89.4)
  Bottom Layer w0.2: v2(85.226,91.246) 85.226,91.47 86.176,91.47 U12_P11.3@86.176,91.246
CELL_N_P21: C55_P21.2 pad.BT2@86.058,102.201 U12_P21.2 U12_P21.3 | length 6.3
  Top Layer w0.3: pad.BT2@86.06,102.2 86.2,102.06 v4(86.3,102.06)
  Inner3 w0.15: v2(85.3,101.2) 84.75,101.2 84.75,102.5 85.226,102.5 86.3,102.5 v4(86.3,102.06)
  Inner3 w0.2: 85.226,102.5 v2(85.226,103.046)
  Bottom Layer w0.15: C55_P21.2@85.12,101.291 85.27,101.29 v2(85.3,101.2)
  Bottom Layer w0.2: v2(85.226,103.046) 85.226,103.27 86.176,103.27 U12_P21.3@86.176,103.046
CELL_P_P11: C52_P11.1 pad.BT1@86.058,85.8 R51_P11.1 U10_P11.A3 U10_P11.B3 | length 3.6
  Top Layer w0.3: pad.BT1@86.06,85.801 v4(86.06,85.82)
  Inner3 w0.2: v2(84.251,87.7) 84.251,87.625 86.06,85.816 v4(86.06,85.82)
  Bottom Layer w0.2: v2(84.251,87.7) U10_P11.A3@84.251,88.099
  Bottom Layer w0.25: v4(86.06,85.82) 86.06,85.782 R51_P11.1@86.093,85.75 ; R51_P11.1@86.093,85.748 86.2,85.64 C52_P11.1@86.2,85.35
CELL_P_P21: C52_P21.1 pad.BT1@86.058,97.601 R51_P21.1 U10_P21.A3 U10_P21.B3 | length 3.6
  Top Layer w0.3: pad.BT1@86.06,97.601 v4(86.06,97.62)
  Inner3 w0.2: v2(84.251,99.5) 84.251,99.425 86.06,97.616 v4(86.06,97.62)
  Bottom Layer w0.2: v2(84.251,99.5) U10_P21.A3@84.251,99.899
  Bottom Layer w0.25: v4(86.06,97.62) 86.06,97.582 R51_P21.1@86.093,97.55 ; R51_P21.1@86.093,97.548 86.2,97.44 C52_P21.1@86.2,97.15
CHG_PG_P11: pad.JP4@86.274,88.94 U10_P11.B1 | length 2.9
  Inner2 w0.1: v6(84.65,88.8) 84.75,88.7 84.75,88 v2(85.051,87.7)
  Inner3 w0.1: v6(84.65,88.8) 86.135,88.8 v2(86.275,88.94)
CHG_PG_P21: pad.JP4@86.274,100.741 U10_P21.B1 | length 2.9
  Inner2 w0.1: v6(84.65,100.6) 84.75,100.5 84.75,99.8 v2(85.051,99.5)
  Inner3 w0.1: v6(84.65,100.6) 86.135,100.6 v2(86.275,100.74)
CHG_PG_R11: pad.JR4@89.185,89.1 R3_R11.2 U1_R11.H5 | length 4.2
  Top Layer w0.1: R3_R11.2@89.599,90.998 89.897,90.997 v4(89.9,91) U1_R11.H5@89.899,90.149
  Bottom Layer w0.1: pad.JR4@89.185,89.1 89.185,89.6 90.17,89.6 90.17,90.43 89.9,90.7 v4(89.9,91)
CHG_PG_R21: pad.JR4@89.185,100.901 R3_R21.2 U1_R21.H5 | length 4.2
  Top Layer w0.1: R3_R21.2@89.599,102.797 89.897,102.797 v4(89.9,102.8) U1_R21.H5@89.899,101.949
  Bottom Layer w0.1: pad.JR4@89.185,100.9 89.185,101.4 90.17,101.4 90.17,102.23 89.9,102.5 v4(89.9,102.8)
DCC_L_R11: L1_R11.2 L2_R11.1 | length 0.9
  Top Layer w0.2: L2_R11.1@89.355,85.6 89.401,85.554 L1_R11.2@89.401,84.701
DCC_L_R21: L1_R21.2 L2_R21.1 | length 0.9
  Top Layer w0.2: L2_R21.1@89.355,97.4 89.401,97.354 L1_R21.2@89.4,96.5
DCC_R11: L1_R11.1 U1_R11.B6 | length 3.6
  Inner2 w0.2: v3(89.5,87.751) 90.325,86.926 90.325,85.175 v3(90.82,84.701)
DCC_R21: L1_R21.1 U1_R21.B6 | length 3.6
  Inner2 w0.2: v3(89.5,99.551) 90.325,98.726 90.325,96.975 v3(90.82,96.501)
DEC1_R11: C4_R11.1 U1_R11.B7 | length 1.8
  Inner1 w0.12: v1(89.101,87.751) 89.445,87.407 89.445,86.495 v1(89.17,86.22)
DEC1_R21: C4_R21.1 U1_R21.B7 | length 1.8
  Inner1 w0.12: v1(89.101,99.551) 89.445,99.207 89.445,98.295 v1(89.17,98.02)
DEC2_R11: C7_R11.1 U1_R11.A2 | length 0.5
  Top Layer w0.12: C7_R11.1@90.88,86.926 91.1,87.106 U1_R11.A2@91.1,87.35
DEC2_R21: C7_R21.1 U1_R21.A2 | length 0.5
  Top Layer w0.12: C7_R21.1@90.88,98.726 91.1,98.906 U1_R21.A2@91.1,99.15
DEC3_R11: C6_R11.1 U1_R11.C2 | length 1.2
  Top Layer w0.12: U1_R11.C2@91.1,88.15 91.75,88.15 92.076,87.785 C6_R11.1@92.076,87.71
DEC3_R21: C6_R21.1 U1_R21.C2 | length 1.2
  Top Layer w0.12: U1_R21.C2@91.1,99.95 91.75,99.95 92.076,99.585 C6_R21.1@92.076,99.51
DEC4_R11: C9_R11.1 L2_R11.2 U1_R11.A6 | length 2.9
  Top Layer w0.12: U1_R11.A6@89.5,87.35 89.5,87.07 C9_R11.1@90.16,87.07 ; C9_R11.1@90.16,86.971 C9_R11.1@90.16,87.07 ; 90.545,87.07 C9_R11.1@90.16,87.07
  Top Layer w0.15: L2_R11.2@90.445,85.6 90.545,85.7 90.545,87.07
DEC4_R21: C9_R21.1 L2_R21.2 U1_R21.A6 | length 2.9
  Top Layer w0.12: U1_R21.A6@89.5,99.15 89.5,98.87 C9_R21.1@90.16,98.87 ; C9_R21.1@90.16,98.77 C9_R21.1@90.16,98.87 ; 90.545,98.87 C9_R21.1@90.16,98.87
  Top Layer w0.15: L2_R21.2@90.445,97.4 90.545,97.5 90.545,98.87
GND_P11: C50_P11.2 C51_P11.2 C52_P11.2 C53_P11.2 C56_P11.2 C60_P11.2 C63_P11.2 D10_P11.2 D12_P11.2 D13_P11.2 pad.JP6@85.723,86.42 pad.JP9@85.723,88.94 R50_P11.2 TH5_P11.2 U10_P11.A4 U10_P11.D3 U11_P11.1 U11_P11.2 U11_P11.3 U11_P11.6 U11_P11.7 U11_P11.9 U12_P11.4 U13_P11.B2 | length 2.5
  Top Layer w0.15: v1(84.65,89.275) U11_P11.2@85.15,89.275 U11_P11.1@85.651,89.275 ; C60_P11.2@84.696,86.41 v1(85.05,86.41)
  Top Layer w0.2: U11_P11.7@83.975,87.6 U11_P11.6@83.975,88.1 v1(83.974,88.129)
  Bottom Layer w0.15: 83.942,88.676 U13_P11.B2@84.175,88.676 ; U10_P11.D3@84.251,86.9 v5(84.251,86.93) ; v5(85.051,89) D10_P11.2@85.051,89.049
  Bottom Layer w0.25: v4(86.404,83.867) C52_P11.2@86.404,84.15
  other v1: 84.977,84.929 86.301,84.97 84.558,85.501 83.78,86.887 84.651,86.926 86.344,87.687 85.2,88.087 85.7,89.2 86.2,89.387 85.051,90.877
  other v3: 85.345,91.643 86.1,91.701
  other v4: 85.8,84.22 84.004,89.936 84.15,90.387 84.534,90.945 85.75,91.987 86.268,92.276
  other v5: 85.041,85.05 84.449,85.536 85.724,86.42 83.85,88.099 83.779,88.567 85.724,88.94 84.531,90.469 86.15,90.65
  other v6: 85.431,85.276 85.944,85.385 84.535,86.064 85.499,88.489 84.2,88.8
GND_P21: C50_P21.2 C51_P21.2 C52_P21.2 C53_P21.2 C56_P21.2 C60_P21.2 C63_P21.2 D10_P21.2 D12_P21.2 D13_P21.2 pad.JP6@85.723,98.221 pad.JP9@85.723,100.741 R50_P21.2 TH5_P21.2 U10_P21.A4 U10_P21.D3 U11_P21.1 U11_P21.2 U11_P21.3 U11_P21.6 U11_P21.7 U11_P21.9 U12_P21.4 U13_P21.B2 | length 2.5
  Top Layer w0.15: v1(84.65,101.075) U11_P21.2@85.15,101.075 U11_P21.1@85.651,101.075 ; C60_P21.2@84.696,98.21 v1(85.05,98.21)
  Top Layer w0.2: U11_P21.7@83.974,99.399 83.974,99.899 v1(83.974,99.929)
  Bottom Layer w0.15: 83.942,100.476 U13_P21.B2@84.175,100.475 ; U10_P21.D3@84.251,98.7 v5(84.251,98.73) ; v5(85.051,100.8) D10_P21.2@85.051,100.849
  Bottom Layer w0.25: v4(86.404,95.667) C52_P21.2@86.404,95.95
  other v1: 84.977,96.729 86.301,96.77 84.558,97.301 83.78,98.687 84.651,98.724 86.344,99.487 85.2,99.887 85.7,101 86.2,101.187 85.051,102.677
  other v3: 85.345,103.443 86.1,103.501
  other v4: 85.8,96.02 84.004,101.736 84.15,102.187 84.534,102.745 85.75,103.787 86.268,104.076
  other v5: 85.041,96.85 84.449,97.336 85.724,98.22 83.85,99.899 83.779,100.367 85.724,100.74 84.531,102.269 86.15,102.45
  other v6: 85.431,97.076 85.944,97.185 84.535,97.864 85.499,100.289 84.2,100.6
GND_R11: C1_R11.2 C2_R11.2 C3_R11.2 C4_R11.2 C5_R11.2 C6_R11.2 C7_R11.2 C8_R11.2 C9_R11.2 C10_R11.2 C12_R11.2 C20_R11.2 C21_R11.2 C30_R11.2 C31_R11.2 C32_R11.2 C40_R11.2 C42_R11.2 pad.JR1@89.185,86.1 pad.JR3@89.185,88.099 pad.JR6@89.784,86.1 R5_R11.2 R41_R11.2 TH1_R11.2 TH4_R11.2 U1_R11.C4 U1_R11.C5 U1_R11.D2 U1_R11.E3 U1_R11.F5 U2_R11.B2 U3_R11.9 U3_R11.10 U3_R11.11 Y1_R11.2 Y1_R11.4 | length 2.1
  Top Layer w0.15: U1_R11.C4@90.3,88.15 v1(90.3,88.18)
  Top Layer w0.2: C3_R11.2@92.05,89.001 v1(92.05,89.45) ; C42_R11.2@92.53,89.786 v1(92.53,90.186) ; C40_R11.2@93.411,87.955 v1(93.442,87.564)
  Bottom Layer w0.15: v5(89.1,88) 89.185,88.085 pad.JR3@89.185,88.099 ; v2(89.176,84.947) 89.228,85.046 U2_R11.B2@89.525,85.046 ; U3_R11.10@91.06,87.5 91.2,87.5 v5(91.3,87.4)
  other v1: 90.63,83.89 92.03,83.96 93.485,84.95 91.601,85.023 92.256,85.1 93.485,85.45 91.999,85.729 93.485,85.95 91.359,86.075 89.718,86.22 90.88,86.377 90.16,86.423 93.485,86.45 89.723,86.75 92.799,86.831 93.3,87.15 92.6,87.73 89.899,88.21 91.1,88.551 90.699,88.95 89.899,89.349 93.4,89.55 92.47,89.786 93.3,90.675 91.16,91.2 89.172,91.294 90.36,91.4
  other v2: 89.176,84.215 89.176,92.22
  other v3: 92.751,91.722 89.449,92.476
  other v4: 90.336,83.539 89.529,83.606 89.11,83.75 93.46,91.05 93.306,91.531 92.442,92.125 92.021,92.323 90.01,92.65
  other v5: 92.03,83.96 91.108,84.2 90.524,84.299 90.295,84.85 92.858,84.901 91.66,85.2 90.56,85.6 89.185,86.1 89.784,86.1 92.06,86.4 91.01,86.89 91.06,88.159 90.46,91.5 89.807,92.15
  other v6: 91.081,83.665 91.26,85.5 92.36,86 92.96,86.4 91.37,86.5 92.06,87.3 90.66,88.5 91.76,88.5 89.42,89.835 90.676,90.174 91.89,90.9 91.135,92.439 90.611,92.469
GND_R21: C1_R21.2 C2_R21.2 C3_R21.2 C4_R21.2 C5_R21.2 C6_R21.2 C7_R21.2 C8_R21.2 C9_R21.2 C10_R21.2 C12_R21.2 C20_R21.2 C21_R21.2 C30_R21.2 C31_R21.2 C32_R21.2 C40_R21.2 C42_R21.2 pad.JR1@89.185,97.901 pad.JR3@89.185,99.9 pad.JR6@89.784,97.901 R5_R21.2 R41_R21.2 TH1_R21.2 TH4_R21.2 U1_R21.C4 U1_R21.C5 U1_R21.D2 U1_R21.E3 U1_R21.F5 U2_R21.B2 U3_R21.9 U3_R21.10 U3_R21.11 Y1_R21.2 Y1_R21.4 | length 2.1
  Top Layer w0.15: U1_R21.C4@90.3,99.95 v1(90.3,99.98)
  Top Layer w0.2: C3_R21.2@92.05,100.801 v1(92.05,101.25) ; C42_R21.2@92.53,101.586 v1(92.53,101.986) ; C40_R21.2@93.412,99.754 v1(93.442,99.364)
  Bottom Layer w0.15: v5(89.1,99.8) 89.185,99.885 pad.JR3@89.185,99.899 ; v2(89.176,96.747) 89.228,96.846 U2_R21.B2@89.525,96.845 ; U3_R21.10@91.06,99.3 91.2,99.3 v5(91.3,99.2)
  other v1: 90.63,95.69 92.03,95.76 93.485,96.75 91.601,96.823 92.256,96.9 93.485,97.25 91.999,97.529 93.485,97.75 91.359,97.875 89.718,98.02 90.88,98.177 90.16,98.223 93.485,98.25 89.723,98.55 92.799,98.631 93.3,98.95 92.6,99.53 89.899,100.01 91.1,100.351 90.699,100.75 89.899,101.149 93.4,101.35 92.47,101.586 93.3,102.475 91.16,103 89.172,103.094 90.36,103.2
  other v2: 89.176,96.015 89.176,104.02
  other v3: 92.751,103.522 89.449,104.276
  other v4: 90.336,95.339 89.529,95.406 89.11,95.55 93.46,102.85 93.306,103.331 92.442,103.925 92.021,104.123 90.01,104.45
  other v5: 92.03,95.76 91.108,96 90.524,96.099 90.295,96.65 92.858,96.701 91.66,97 90.56,97.4 89.185,97.9 89.784,97.9 92.06,98.2 91.01,98.69 91.06,99.959 90.46,103.3 89.807,103.95
  other v6: 91.081,95.465 91.26,97.3 92.36,97.8 92.96,98.2 91.37,98.3 92.06,99.1 90.66,100.3 91.76,100.3 89.42,101.635 90.676,101.974 91.89,102.7 91.135,104.239 90.611,104.269
I2C_SCL_P11: pad.JP8@85.723,88.099 U10_P11.E3 U11_P11.13 | length 2.3
  Inner2 w0.1: v2(84.251,86.499) 85.325,87.573 85.325,87.775 85.649,88.099 v4(85.724,88.099)
I2C_SCL_P21: pad.JP8@85.723,99.9 U10_P21.E3 U11_P21.13 | length 2.3
  Inner2 w0.1: v2(84.251,98.299) 85.325,99.373 85.325,99.575 85.649,99.899 v4(85.724,99.899)
I2C_SCL_R11: pad.JR8@89.784,88.099 R2_R11.2 U1_R11.H3 U3_R11.2 | length 9.9
  Top Layer w0.1: U1_R11.H3@90.699,90.149 v4(90.7,91)
  Inner2 w0.1: v4(90.7,91) 90.7,91.839 v2(90.91,92.049)
  Inner3 w0.1: v4(90.7,91) 90.7,91.22 92.45,91.22 92.45,89.45 v2(92.7,89.45)
  Bottom Layer w0.1: pad.JR8@89.784,88.099 90.4,88.099 90.5,88.2 90.5,90.8 v4(90.7,91) ; v2(92.7,89.45) 92.85,89.301 U3_R11.2@92.959,89.301
I2C_SCL_R21: pad.JR8@89.784,99.9 R2_R21.2 U1_R21.H3 U3_R21.2 | length 9.9
  Top Layer w0.1: U1_R21.H3@90.699,101.949 v4(90.7,102.8)
  Inner2 w0.1: v4(90.7,102.8) 90.7,103.639 v2(90.91,103.849)
  Inner3 w0.1: v4(90.7,102.8) 90.7,103.02 92.45,103.02 92.45,101.25 v2(92.7,101.25)
  Bottom Layer w0.1: pad.JR8@89.784,99.899 90.4,99.899 90.5,100 90.5,102.6 v4(90.7,102.8) ; v2(92.7,101.25) 92.85,101.101 U3_R21.2@92.96,101.1
I2C_SDA_P11: pad.JP7@85.723,87.261 U10_P11.E2 U11_P11.14 | length 3.8
  Top Layer w0.1: U11_P11.14@85.826,88.6 86.151,88.6 v3(86.35,88.4)
  Inner2 w0.1: v2(84.65,86.499) 85.724,86.499 v2(85.724,87.261)
  Inner3 w0.1: v2(85.724,87.261) 86.35,87.887 v3(86.35,88.4)
I2C_SDA_P21: pad.JP7@85.723,99.062 U10_P21.E2 U11_P21.14 | length 3.8
  Top Layer w0.1: U11_P21.14@85.826,100.4 86.151,100.4 v3(86.35,100.2)
  Inner2 w0.1: v2(84.65,98.299) 85.724,98.299 v2(85.724,99.061)
  Inner3 w0.1: v2(85.724,99.061) 86.35,99.687 v3(86.35,100.2)
I2C_SDA_R11: pad.JR7@89.784,87.101 R1_R11.2 U1_R11.H4 U3_R11.1 | length 11.3
  Top Layer w0.1: U1_R11.H4@90.3,90.15 v4(90.3,91)
  Inner2 w0.1: v2(90.3,87.7) v4(90.3,91)
  Inner3 w0.1: v4(90.3,91) 90.3,91.45 93.015,91.45 93.015,89.965 v2(92.9,89.85)
  Bottom Layer w0.1: R1_R11.2@89.2,91.493 89.2,91.33 90.15,91.33 90.3,91.18 v4(90.3,91) ; pad.JR7@89.784,87.101 89.9,87.217 89.9,87.3 v2(90.3,87.7)
I2C_SDA_R21: pad.JR7@89.784,98.902 R1_R21.2 U1_R21.H4 U3_R21.1 | length 11.3
  Top Layer w0.1: U1_R21.H4@90.3,101.949 v4(90.3,102.8)
  Inner2 w0.1: v2(90.3,99.5) v4(90.3,102.8)
  Inner3 w0.1: v4(90.3,102.8) 90.3,103.25 93.015,103.25 93.015,101.765 v2(92.9,101.65)
  Bottom Layer w0.1: R1_R21.2@89.2,103.292 89.2,103.13 90.15,103.13 90.3,102.98 v4(90.3,102.8) ; pad.JR7@89.784,98.901 89.9,99.017 89.9,99.1 v2(90.3,99.5)
IMU_INT1_P11: pad.JP5@86.274,89.781 U11_P11.4 | length 3.4
  Top Layer w0.1: v3(83.9,89.55) 84.149,89.301 U11_P11.4@84.15,89.275
  Inner3 w0.1: v3(83.9,89.55) 84.325,89.125 85.9,89.125 86.275,89.5 v2(86.275,89.781)
IMU_INT1_P21: pad.JP5@86.274,101.581 U11_P21.4 | length 3.4
  Top Layer w0.1: v3(83.9,101.35) 84.149,101.101 U11_P21.4@84.15,101.075
  Inner3 w0.1: v3(83.9,101.35) 84.325,100.925 85.9,100.925 86.275,101.3 v2(86.275,101.581)
IMU_INT1_R11: pad.JR5@89.185,90.101 U1_R11.H6 | length 1.1
  Top Layer w0.1: U1_R11.H6@89.5,90.15 89.5,90.58 v4(89.52,90.6)
  Bottom Layer w0.1: pad.JR5@89.185,90.101 89.185,90.265 v4(89.52,90.6)
IMU_INT1_R21: pad.JR5@89.185,101.901 U1_R21.H6 | length 1.1
  Top Layer w0.1: U1_R21.H6@89.5,101.949 89.5,102.38 v4(89.52,102.4)
  Bottom Layer w0.1: pad.JR5@89.185,101.901 89.185,102.065 v4(89.52,102.4)
NRESET_TP_R11: pad.TP1@91.951,91.5 U1_R11.H1 | length 1.6
  Top Layer w0.1: U1_R11.H1@91.499,90.149 91.65,90.299 91.65,91.35 91.801,91.35 pad.TP1@91.951,91.5
NRESET_TP_R21: pad.TP1@91.951,103.301 U1_R21.H1 | length 1.6
  Top Layer w0.1: U1_R21.H1@91.499,101.949 91.65,102.099 91.65,103.15 91.801,103.15 pad.TP1@91.951,103.3
NTC_EN_R11: R10_R11.1 R11_R11.1 U1_R11.G3 | length 3.1
  Top Layer w0.1: v3(92,90.45) 92.008,90.45 R11_R11.1@92.258,90.7
  Inner2 w0.1: v3(90.699,89.75) 91.31,90.36 91.44,90.36 ; v2(91.44,90.9) 91.44,90.36 ; v3(92,90.45) 92,90.36 91.44,90.36
  Bottom Layer w0.1: v2(91.44,90.9) R10_R11.1@91.441,91.5
NTC_EN_R21: R10_R21.1 R11_R21.1 U1_R21.G3 | length 3.1
  Top Layer w0.1: v3(92,102.25) 92.008,102.25 R11_R21.1@92.258,102.5
  Inner2 w0.1: v3(90.699,101.55) 91.31,102.16 91.44,102.16 ; v2(91.44,102.7) 91.44,102.16 ; v3(92,102.25) 92,102.16 91.44,102.16
  Bottom Layer w0.1: v2(91.44,102.7) R10_R21.1@91.441,103.3
PPG_GPIO_R11: pad.TP2@92.05,91.551 U3_R11.13 | length 3
  Bottom Layer w0.1: U3_R11.13@91.06,89.301 91.65,89.301 91.65,90.676 92.05,91.076 pad.TP2@92.05,91.551
PPG_GPIO_R21: pad.TP2@92.05,103.352 U3_R21.13 | length 3
  Bottom Layer w0.1: U3_R21.13@91.06,101.1 91.65,101.101 91.65,102.476 92.05,102.876 pad.TP2@92.05,103.351
PPG_INT_R11: U1_R11.H2 U3_R11.14 | length 1.1
  Top Layer w0.1: U1_R11.H2@91.1,90.15 v4(91.1,90.55)
  Bottom Layer w0.1: U3_R11.14@91.06,89.9 91.1,89.941 v4(91.1,90.55)
PPG_INT_R21: U1_R21.H2 U3_R21.14 | length 1.1
  Top Layer w0.1: U1_R21.H2@91.1,101.949 v4(91.1,102.35)
  Bottom Layer w0.1: U3_R21.14@91.06,101.7 91.1,101.741 v4(91.1,102.35)
PPG_LDO_EN_R11: R5_R11.1 U1_R11.G2 U3_R11.3 | length 8.3
  Inner3 w0.1: v3(91.1,89.75) 91.1,90.15 92.25,90.15 92.25,88.9 92.66,88.9 v2(92.66,88.57)
  Bottom Layer w0.1: v2(92.66,88.57) 92.791,88.701 92.959,88.701 93.48,88.701 93.48,85.041 R5_R11.1@93.34,84.901